# Altium PCB CH32V4x7V-R0.PcbDoc (part 1 of 3)
Units mm, origin at the board's own origin, x right, y up, seen from the top; angles counter-clockwise.
Board outline 106.4 x 69.09 mm, 2 copper layers (Top Layer, Bottom Layer); 78 components, 117 nets, 431 pads, 740 vias.
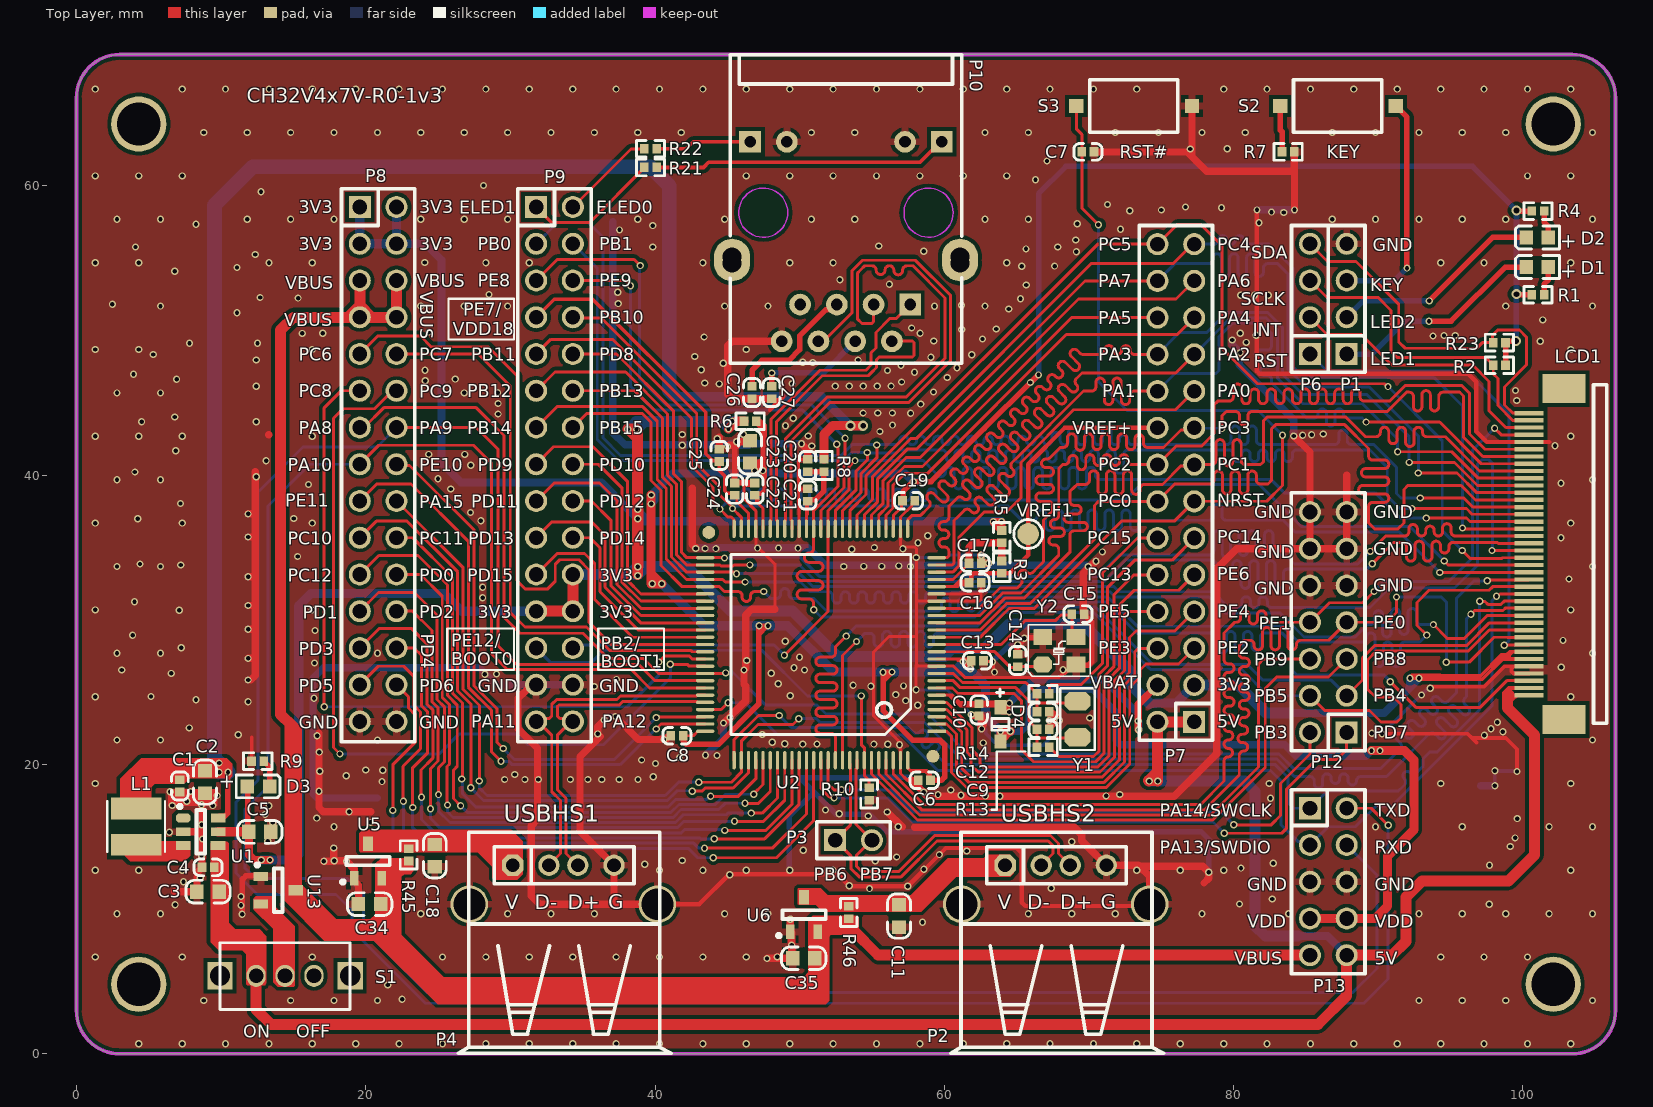
[diagram p0: Top Layer view]
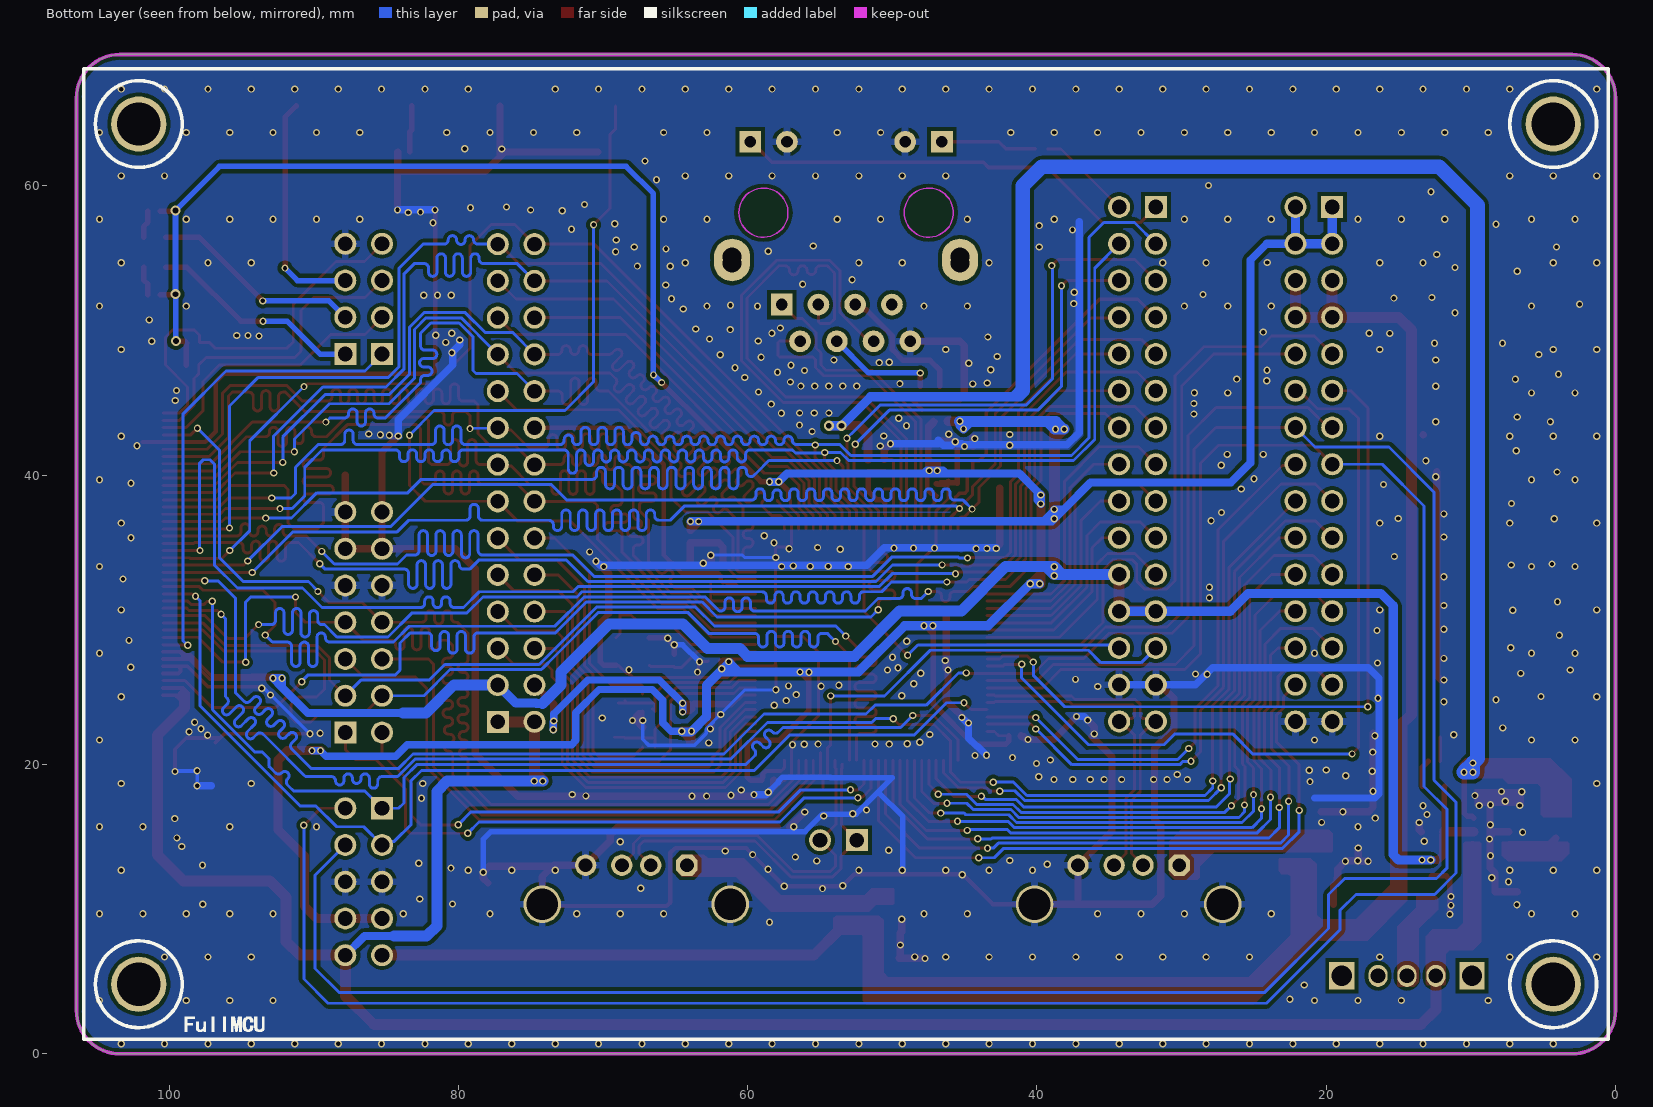
[diagram p1: Bottom Layer view, seen from below]

## Layer stack, top to bottom
Top Solder: solder mask 0.0102, Solder Resist, Dk 3.5
Top Layer: signal copper 0.0356
Dielectric 1: dielectric 0.32, FR-4, Dk 4.8
Bottom Layer: signal copper 0.0356
Bottom Solder: solder mask 0.0102, Solder Resist, Dk 3.5

## Board outline
0,3 0,66.09 cw(c3,66.09) 3,69.09 103.4,69.09 cw(c103.4,66.09) 106.4,66.09 106.4,3 cw(c103.4,3) 103.4,0 3,0 cw(c3,3)

## Design rules (kind name [scope] priority, off if disabled: settings)
Clearance Clearance_1 [InPolygon] p1: gap=0.254 ignorepadtopadclearanceinfootprint=FALSE
Clearance [All] p2: gap=0.152 ignorepadtopadclearanceinfootprint=FALSE except(0.203: Arc-Via Track-Via SMDPad-Via THPad-Via Via-Via Via-Fill Via-Poly Via-Region Via-Hole)
ComponentClearance [All] p1 off: gap=0.254 collisioncheckmode=3 verticalgap=0.254 showdistances=FALSE
DiffPairsRouting [All] p1: maxlimit=0.254 minlimit=0.178 mostfreqgap=0.203 toplayer_minwidth=0.152 toplayer_maxwidth=0.381 toplayer_prefwidth=0.203 bottomlayer_minwidth=0.152 bottomlayer_maxwidth=0.381 bottomlayer_prefwidth=0.203 maxuncoupledlength=12.7
MinimumSolderMaskSliver [All] p1 off: minsoldermaskwidth=0.254
PolygonConnect PolygonConnect_1 [IsVia] p1: connectstyle=Direct reliefconductorwidth=0.254 reliefentries=4 polygonreliefangle="90 Angle" airgapwidth=0.254
PolygonConnect [All] p2: connectstyle=Relief reliefconductorwidth=0.508 reliefentries=4 polygonreliefangle="90 Angle" airgapwidth=0.254
RoutingVias [All] p1: holewidth=0.406 width=0.711 viastyle="Through Hole" minholewidth=0.3 minwidth=0.5 maxholewidth=0.711 maxwidth=1.27
SilkToSilkClearance [All] p1 off: silktosilkclearance=0.254
SilkToSolderMaskClearance [IsPad] p1 off: minsilkscreentomaskgap=0.254 clearancetoexposedcopper=TRUE
SolderMaskExpansion [All] p1: expansion=0.051 istentingtop=FALSE
Width [All] p1: maxlimit=2.54 minlimit=0.127 preferedwidth=0.254
25 further rules are at their usual default settings.

## Classes and differential pairs
component class CH32V467VET-R0: C1 C2 C3 C4 C5 C6 C7 C8 C9 C10 C11 C12 C13 C14 C15 C16 C17 C18 C19 C20 C21 C22 C23 C24 C25 C26 C27 C34 C35 D1 D2 D3 D4 L1 LCD1 P1 P2 P3 P4 P6 P7 P8 P9 P10 P12 P13 R1 R2 R3 R4 R5 R6 R7 R8 R9 R10 R13 R14 R21 R22 R23 R45 R46 S1 S2 S3 U1 U2 U5 U6 U13 VREF1 Y1 Y2
differential pair MDIR: +MDIRP -MDIRN
differential pair MDIT: +MDITN -MDITP
differential pair PA12PA11: +PA12 -PA11
differential pair PB6PB7: +PB6 -PB7

## Components (designator, comment, footprint, x,y, rotation, side; value= is the part's Value field where it differs from the comment)
C1 "NC(0.1uF)" 0402_C 7.154,18.098 r180 top
C2 "NC(10uF)" 0603_C 8.882,18.022 r90 top
C3 "10uF" 0603_C 8.33,11.212 r0 top
C4 "1uF" 0402_C 8.675,12.889 r90 top
C5 "10uF" 0603_C 13.442,15.352 r180 top
C6 "0.1uF" 0402_C 58.186,18.912 r90 top
C7 "22nF" 0402_C 70.349,62.35 r270 top
C8 "0.1uF" 0402_C 41.94,21.989 r270 top
C9 "12pF" 0402_C 67.254,22.434 r270 top
C10 "0.1uF" 0402_C 62.396,23.358 r180 top
C11 "10uF" 0603_C 56.864,10.295 r270 top
C12 "12pF" 0402_C 67.254,23.662 r270 top
C13 "0.1uF" 0402_C 61.852,27.168 r90 top
C14 "18pF" 0402_C 65.071,27.621 r0 top
C15 "18pF" 0402_C 69.663,30.403 r270 top
C16 "0.1uF" 0402_C 61.702,32.581 r90 top
C17 "0.1uF" 0402_C 61.702,33.921 r90 top
C18 "10uF" 0603_C 24.775,14.473 r270 top
C19 "0.1uF" 0402_C 57.954,38.239 r270 top
C20 "2.2uF" 0402_C 50.553,41.099 r0 top
C21 "0.1uF" 0402_C 50.553,39.058 r0 top
C22 "0.1uF" 0402_C 46.9,39.461 r0 top
C23 "10uF" 0603_C 46.57,42.387 r270 top
C24 "0.1uF" 0402_C 45.502,39.461 r0 top
C25 "2.2uF" 0402_C 44.441,41.795 r0 top
C26 "0.1uF" 0402_C 46.702,45.293 r180 top
C27 "0.1uF" 0402_C 48.055,45.293 r180 top
C34 "10uF" 0603_C 21.037,10.349 r180 top
C35 "10uF" 0603_C 51.047,6.61 r180 top
D1 "BLUE" 0603+ 101.758,54.392 r180 top
D2 "RED" 0603+ 101.758,56.437 r180 top
D3 "RED" 0603+ 11.81,18.492 r0 top
D4 "B0520WS" SOD-323 63.875,23.953 r270 top
L1 "NC(2.2uH)" CD32 4.13,15.713 r90 top
LCD1 "NC(MY-RGB)" FPC40P-0.5-FK750M3 101.63,34.545 r270 top
P1 "HEADER 4" SIP4-2.54mm 87.813,48.38 r180 top
P2 "USBHS2" USBAF 64.198,13.039 r0 top
P3 "HEADER 2" SIP2-2.54mm 52.451,14.77 r270 top
P4 "USBHS1" USBAF 30.162,13.039 r0 top
P6 "NC(HEADER 4)" SIP4-2.54mm 85.273,48.38 r180 top
P7 "HEADER 14x2" IDC28-2.54MM 77.272,22.955 r180 top
P8 "HEADER 15x2" IDC30-2.54MM 19.588,58.54 r0 top
P9 "HEADER 15x2" IDC30-2.54MM 31.78,58.54 r0 top
P10 "HR911105A" HR911105A 57.645,51.801 r180 top
P12 "HEADER 7x2" IDC14-2.54mm 87.813,22.218 r180 top
P13 "LINK" IDC10-2.54mm 85.273,6.818 r0 top
R1 "1K" 0402 100.613,52.477 r0 top
R2 "NC(4.7K)" 0402 98.792,47.609 r180 top
R3 "0R" 0402 63.961,34.065 r270 top
R4 "1K" 0402 100.613,58.264 r0 top
R5 "0R" 0402 63.961,36.178 r270 top
R6 "0R" 0402 46.151,43.727 r0 top
R7 "10K" 0402 84.192,62.35 r180 top
R8 "NC(0R)" 0402 51.676,40.249 r90 top
R9 "1K" 0402 12.958,20.238 r180 top
R10 "10K" 0402 54.796,17.541 r90 top
R13 "NC(0R)" 0402 67.254,21.207 r180 top
R14 "NC(0R)" 0402 67.254,24.89 r180 top
R21 "470" 0402 39.258,61.28 r0 top
R22 "470" 0402 39.258,62.562 r0 top
R23 "NC(4.7K)" 0402 98.792,49.17 r180 top
R45 "NC(0Ω)" 0402 22.959,13.33 r90 top
R46 "NC(0Ω)" 0402 53.397,9.347 r90 top
S1 "SW SPDT" SW1 14.421,5.392 r0 top
S2 "KEY" SMD_6.1x3.65x2.5mm-KEY 91.216,65.525 r180 top
S3 "RST#" SMD_6.1x3.65x2.5mm-KEY 77.119,65.525 r180 top
U1 "CH2003V" SOT-23-6 7.394,16.302 r270 top
U2 "CH32V467VET" LQFP100 59.464,22.298 r90 top
U5 "CH213" SOT-23-3 19.216,12.132 r0 top
U6 "CH213" SOT-23-3 49.355,8.427 r0 top
U13 "CH213" SOT-23-3 12.752,12.26 r270 top
VREF1 "PAD" TESTPOINT1 65.796,35.938 r90 top
Y1 "32768Hz" FC-135 69.199,21.888 r90 top
Y2 "25MHz" XT3225 66.799,26.917 r0 top
? "" HOLE 4.31,4.81 r180 bottom
? "Comment" HOLE 4.31,64.28 r180 bottom
? "Comment" HOLE 102.09,64.28 r180 bottom
? "Comment" HOLE 102.09,4.81 r180 bottom

## Footprints (in the part's own frame and the unit in brackets; to place one, negate y for a bottom-side part, rotate by r counter-clockwise, add the part's x,y. Pads: shape width x height; smd on the part's side, far side on the other; paste and mask are expansions set on the pad)
0402 [mm]
  rect 0.6x0.65 smd mask+0.051: 1(0,0) 2(0.85,0)
  silkscreen extent -0.55,-0.58 1.4,0.57
0402_C [mm]
  rect 0.65x0.6 smd mask+0.051: 1(0,0) 2(0,-0.85)
  silkscreen extent -0.58,-1.4 0.57,0.55
0603+ [mm]
  rect 0.93x0.98 smd: 1(0,0) 2(1.54,0)
  silkscreen extent -0.76,-0.79 2.27,0.79
0603_C [mm]
  rect 0.93x0.98 smd mask+0.051: 1(0,0) 2(1.54,0)
  silkscreen extent -0.76,-0.79 2.31,0.79
CD32 [mm]
  rect 1.5x3.5 smd: 1(-1.25,0) 2(1.25,0)
  silkscreen extent -1.75,-2 1.75,2
FC-135 [mil]
  oct 50x70 smd: 1(0,0) 2(98.43,0)
  silkscreen extent -35,-47 133,47
FPC40P-0.5-FK750M3 [mm]
  rect 2x3 smd: 0(-11.436,1.202) 0(11.436,1.202)
  rect 0.3x2 smd: 1(9.75,-1.202) 2(9.25,-1.202) 3(8.75,-1.202) 4(8.25,-1.202) 5(7.75,-1.202) 6(7.25,-1.202) 7(6.75,-1.202) 8(6.25,-1.202) 9(5.75,-1.202) 10(5.25,-1.202) 11(4.75,-1.202) 12(4.25,-1.202) 13(3.75,-1.202) 14(3.25,-1.202) 15(2.75,-1.202) 16(2.25,-1.202) 17(1.75,-1.202) 18(1.25,-1.202) 19(0.75,-1.202) 20(0.25,-1.202) 21(-0.25,-1.202) 22(-0.75,-1.202) 23(-1.25,-1.202) 24(-1.75,-1.202) 25(-2.25,-1.202) 26(-2.75,-1.202) 27(-3.25,-1.202) 28(-3.75,-1.202) 29(-4.25,-1.202) 30(-4.75,-1.202) 31(-5.25,-1.202) 32(-5.75,-1.202) 33(-6.25,-1.202) 34(-6.75,-1.202) 35(-7.25,-1.202) 36(-7.75,-1.202) 37(-8.25,-1.202) 38(-8.75,-1.202) 39(-9.25,-1.202) 40(-9.75,-1.202)
  silkscreen extent -11.7,3.24 11.7,4.17, body extent -12.2,-1.75 12.2,4.55, height 2
HOLE [mm]
  round 3.81 hole 3: 0(0,0)
  silkscreen extent -3,-3 3,3
HR911105A [mm]
  rect 1.5x1.5 hole 0.8: 1(0,0) 9(-2.175,-11.252) 12(11.075,-11.252)
  round 1.5 hole 0.8: 2(1.27,2.54) 3(2.54,0) 4(3.81,2.54) 5(5.08,0) 6(6.35,2.54) 7(7.62,0) 8(8.89,2.54) 10(0.365,-11.252) 11(8.535,-11.252)
  round 2.5 hole 1.3: ""(-3.43,-2.852) ""(-3.43,-3.3) ""(12.32,-3.3) ""(12.32,-2.852)
  Keep-Out Layer circle w0.1: c10.165,-6.352 r1.7
  Keep-Out Layer circle w0.1: c-1.265,-6.352 r1.7
  silkscreen extent -3.55,-17.27 12.45,4.06
IDC10-2.54mm [mil]
  rect 60x60 hole 40: 1(0,400)
  round 60 hole 40: 2(100,400) 3(0,300) 4(100,300) 5(0,200) 6(100,200) 7(0,100) 8(100,100) 9(0,0) 10(100,0)
  silkscreen extent -50,-50 150,450
IDC14-2.54mm [mil]
  rect 60x60 hole 40: 1(0,0)
  round 60 hole 40: 2(100,0) 3(0,-100) 4(100,-100) 5(0,-200) 6(100,-200) 7(0,-300) 8(100,-300) 9(0,-400) 10(100,-400) 11(0,-500) 12(100,-500) 13(0,-600) 14(100,-600)
  silkscreen extent -50,-652 151,50
IDC28-2.54MM [mil]
  rect 60x60 hole 40: 1(0,0)
  round 60 hole 40: 2(100,0) 3(0,-100) 4(100,-100) 5(0,-200) 6(100,-200) 7(0,-300) 8(100,-300) 9(0,-400) 10(100,-400) 11(0,-500) 12(100,-500) 13(0,-600) 14(100,-600) 15(0,-700) 16(100,-700) 17(0,-800) 18(100,-800) 19(0,-900) 20(100,-900) 21(0,-1000) 22(100,-1000) 23(0,-1100) 24(100,-1100) 25(0,-1200) 26(100,-1200) 27(0,-1300) 28(100,-1300)
  silkscreen extent -50,-1351 150,50
IDC30-2.54MM [mil]
  rect 60x60 hole 40: 1(0,0)
  round 60 hole 40: 2(100,0) 3(0,-100) 4(100,-100) 5(0,-200) 6(100,-200) 7(0,-300) 8(100,-300) 9(0,-400) 10(100,-400) 11(0,-500) 12(100,-500) 13(0,-600) 14(100,-600) 15(0,-700) 16(100,-700) 17(0,-800) 18(100,-800) 19(0,-900) 20(100,-900) 21(0,-1000) 22(100,-1000) 23(0,-1100) 24(100,-1100) 25(0,-1200) 26(100,-1200) 27(0,-1300) 28(100,-1300) 29(0,-1400) 30(100,-1400)
  silkscreen extent -50,-1455 150,50
LQFP100 [mm]
  round 0.889 smd: 0(-1.727,0.254) 0(13.746,15.748)
  rect 0.229x1.27 smd mask+0.051: 1(0,0)
  oval 0.229x1.27 smd mask+0.051: 2(0.5,0) 3(1,0) 4(1.5,0) 5(2,0) 6(2.5,0) 7(3,0) 8(3.5,0) 9(4,0) 10(4.5,0) 11(5,0) 12(5.5,0) 13(6,0) 14(6.5,0) 15(7,0) 16(7.5,0) 17(8,0) 18(8.5,0) 19(9,0) 20(9.5,0) 21(10,0) 22(10.5,0) 23(11,0) 24(11.5,0) 25(12,0) 51(12,16) 52(11.5,16) 53(11,16) 54(10.5,16) 55(10,16) 56(9.5,16) 57(9,16) 58(8.5,16) 59(8,16) 60(7.5,16) 61(7,16) 62(6.5,16) 63(6,16) 64(5.5,16) 65(5,16) 66(4.5,16) 67(4,16) 68(3.5,16) 69(3,16) 70(2.5,16) 71(2,16) 72(1.5,16) 73(1,16) 74(0.5,16) 75(0,16)
  oval 1.27x0.229 smd mask+0.051: 26(14,2) 27(14,2.5) 28(14,3) 29(14,3.5) 30(14,4) 31(14,4.5) 32(14,5) 33(14,5.5) 34(14,6) 35(14,6.5) 36(14,7) 37(14,7.5) 38(14,8) 39(14,8.5) 40(14,9) 41(14,9.5) 42(14,10) 43(14,10.5) 44(14,11) 45(14,11.5) 46(14,12) 47(14,12.5) 48(14,13) 49(14,13.5) 50(14,14) 76(-2,14) 77(-2,13.5) 78(-2,13) 79(-2,12.5) 80(-2,12) 81(-2,11.5) 82(-2,11) 83(-2,10.5) 84(-2,10) 85(-2,9.5) 86(-2,9) 87(-2,8.5) 88(-2,8) 89(-2,7.5) 90(-2,7) 91(-2,6.5) 92(-2,6) 93(-2,5.5) 94(-2,5) 95(-2,4.5) 96(-2,4) 97(-2,3.5) 98(-2,3) 99(-2,2.5) 100(-2,2)
  silkscreen extent -0.22,1.79 12.21,14.21
SIP2-2.54mm [mil]
  rect 60x60 hole 40: 1(0,0)
  round 60 hole 40: 2(0,100)
  silkscreen extent -50,-50 50,150
SIP4-2.54mm [mil]
  rect 60x60 hole 40: 1(0,0)
  round 60 hole 40: 2(0,-100) 3(0,-200) 4(0,-300)
  silkscreen extent -50,-350 50,50
SMD_6.1x3.65x2.5mm-KEY [mm]
  rect 1x1 smd: 1(0,0) 2(8,0)
  silkscreen extent 0.98,-1.83 7.08,1.83
SOD-323 [mm]
  rect 1x0.83 smd: 1(0,0) 2(2.36,0)
  silkscreen extent -1.28,-0.6 1.58,0.6
SOT-23-3 [mm] "SOT-23-3"
  rect 0.6x1 smd: 1(0,0) 2(1.9,0)
  rect 0.7x1 smd: 3(0.95,2.4)
  silkscreen extent -0.93,-0.38 2.45,1.49
SOT-23-6 [mm] "SOT-23-6"
  oct 0.6x1 smd: 1(0,0)
  rect 0.6x1 smd: 2(0.95,0) 3(1.9,0) 5(0.95,2.4) 6(0,2.4)
  rect 0.6x1.04 smd: 4(1.9,2.4)
  silkscreen extent -0.93,-0.38 2.45,1.49
SW1 [mm]
  rect 1.75x1.9 hole 1.4: 0(-4.5,0) 0(4.5,0)
  oval 1.321x1.524 hole 1.016: 1(0,0) 2(-2,0) 3(2,0)
  silkscreen extent -4.51,-2.31 4.5,2.29
TESTPOINT1 [mm]
  round 1.5 smd: 1(0,0)
  silkscreen extent -1,-1 1,1
USBAF [mm]
  round 2.6 hole 2.2: 0(-3,-2.7) 0(10,-2.7)
  oct 1.473x1.473 hole 0.965: 1(0,0)
  round 1.473 hole 0.965: 2(2.5,0) 3(4.5,0) 4(7,0)
  silkscreen extent -3.75,-12.99 10.95,2.29
XT3225 [mm]
  oct 1.3x1.1 smd: 1(0,0)
  rect 1.3x1.1 smd: 2(2.3,0) 3(2.3,1.9) 4(0,1.9)
  silkscreen extent -1.02,-0.8 3.27,2.74

## Part data
C1 C2 C3 C4 C5 C6 C7 C8 C9 C10 C11 C12 C13 C14 C15 C16 C17 C18 C19 C20 C21 C22 C23 C24 C25 C26 C27 C34 C35: library part CAP, "Capacitor"
D1 D2 D3: library part LED0, "Typical INFRARED GaAs LED", LatestRevisionDate=08-Jul-2005, LatestRevisionNote="Mech Layer 1 removed.", PackageDescription="LED; 2 Leads", PackageReference=LED-0, Published=8-Jun-2000, Publisher="Altium Limited"
D4: library part DIODE, "Diode"
L1: library part INDUCTOR
LCD1: library part MY-RGB
P1: "Header, 4-Pin"
P2 P4: library part USB, "USB Port"
P3: "Header, 2-Pin"
P6: library part "HEADER 4", "Header, 4-Pin"
P7: "Header, 14-Pin, Dual row"
P8 P9: "Header, 15-Pin, Dual row"
P12: "Header, 7-Pin, Dual row"
P13: library part "Header 5X2H", "Header, 5-Pin, Dual row, Right Angle", LatestRevisionDate=17-Jul-2002, LatestRevisionNote="Re-released for DXP Platform.", Publisher="Altium Limited"
R1 R2 R4 R7 R9 R10 R13 R14 R21 R22 R23 R45 R46: library part RES
R3 R5 R6 R8: library part R
S2 S3: library part KEY1
U1: "Step-Down DC-DC Converter, 5V input, 1.23V * 800mA output, with LDO 3.3V * 200mA"
U2: "RISC-V FPU HD-MCU, 175MHz, USB_480M, 100M Ethernet & Phy, CAN, DVP, ADC, DAC, SRAM"
U5 U6 U13: library part CH213E, "Ideal Diode 5V*1A"
VREF1: "焊盘"
Y1 Y2: library part XTAL, "Crystal Oscillator", LatestRevisionDate=17-Jul-2002, LatestRevisionNote="Re-released for DXP Platform.", PackageDescription="Crystal, Thru-Hole; 2 Leads; Body 3.1 x 8.2 mm (Dia.xH)", PackageReference=R38, Published=8-Jun-2000, Publisher="Altium Limited"

## Via types
v1: diameter 0.5, hole 0.3, Top Layer to Bottom Layer, tented both sides, 735 vias
v2: diameter 0.7, hole 0.4, Top Layer to Bottom Layer, tented both sides, 5 vias

## Nets (pads, with @x,y where several pads share a name; then routed paths per layer and width w, separated by ;. In a path a pad name is that pad's centre, name@x,y a point inside that pad or via, vN(x,y) a via of type N, cw(c..) or ccw(c..) an arc to the next point about the centre after c; other vN are vias at no path point)
1V2: C1.2 C2.2 L1.2 R8.2 U1.6 | length 122.1
  Top Layer w0.381: U1.6@9.794,16.302 9.904,16.412 10.248,16.412 10.471,16.635 10.471,19.255 v1@10.355,19.37
  Top Layer w0.635: L1.2@4.13,17.395 4.13,18.316 5.298,19.483 C2.2@8.803,19.483 ; R8.2@51.676,41.117 51.676,42.811 52.303,43.438 53.502,43.438 53.514,43.426 53.535,43.426 53.539,43.421 v2(54.385,43.421) ; C2.2@8.803,19.483 10.468,19.483 10.468,19.51 9.851,20.127 9.447,20.127 C2.2@8.803,19.483
  Bottom Layer w0.635: 40.782,46.269 40.782,45.816 41.172,45.426 41.679,45.426 ; 40.972,46.133 41.679,45.426 ; v2(54.385,43.421) v2(53.502,43.421) 51.497,45.426 41.679,45.426
  Bottom Layer w1.016: 40.972,46.133 40.972,60.021 39.678,61.315 12.187,61.315 9.541,58.67 9.541,20.427 v1(9.862,20.105) ; v1(9.862,20.105) 10.48,19.488 v1(10.48,19.461) v1(9.862,19.461) v1(9.862,20.105)
3V3: C5.2 D3.1 LCD1.6 LCD1.7 P7.3 P8.1 P8.2 P8.3 P8.4 P9.22 P9.23 P9.24 R5.1 R6.1 U1.5 | length 238.4
  Top Layer w0.254: v1@92.163,25.972 v1@92.228,25.972 ; v1@92.192,26.041 92.302,26.15 94.266,26.15 ; v1@92.206,25.993 v1@92.228,25.972 ; v1@92.834,25.902 97.183,25.902 98.577,27.295 98.581,27.295 ; v1@92.834,26.142 97.084,26.142 98.512,27.571 98.857,27.571 ; 93.486,25.972 v1@92.228,25.972 ; 93.495,25.963 v1(92.808,25.963) 92.236,25.963 v1@92.228,25.972 ; 98.774,27.45 98.86,27.45 99.015,27.295 ; 99.055,27.376 99.055,27.571 ; LCD1.6@100.428,27.295 99.015,27.295 ; LCD1.7@100.428,27.795 99.279,27.795 ; 98.581,27.295 98.857,27.571 ; 98.581,27.295 99.015,27.295 ; 98.857,27.571 99.055,27.571 ; 98.857,27.571 99.081,27.795 99.279,27.795 ; 99.055,27.571 99.279,27.795
  Top Layer w0.381: D3.1@11.81,18.492 11.856,18.446 11.856,15.398 C5.2@11.902,15.352
  Top Layer w0.508: v1(63.388,36.803) 63.4,36.791 v1@63.867,36.791 ; v1@63.398,36.763 63.398,36.716 63.936,36.178 R5.1@63.961,36.178 63.961,36.797 v1(63.955,36.803)
  Top Layer w0.559: C5.2@11.902,15.352 11.902,15.178 11.939,15.142 11.939,13.757 12.292,13.404 v1(12.777,13.404) ; v1@12.779,13.404 v1(13.38,13.404)
  Top Layer w0.635: U1.5@9.794,15.352 C5.2@11.902,15.352 ; v1(45.073,43.203) 45.597,43.727 R6.1@46.151,43.727
  Top Layer w0.762: P9.23@31.78,30.6 P9.24@34.32,30.6 P9.22@34.32,33.14 ; v1(38.117,43.183) v1(38.713,43.183) 38.792,43.104 38.792,42.564 ; v1@38.214,43.141 38.792,42.564 ; v1@38.797,33.134 v1(38.797,33.679) 38.803,33.685 v1(38.803,36.985) v1(38.803,37.639) 38.792,37.651 38.792,42.564
  Bottom Layer w0.559: P8.4@22.128,56 24.116,56 25.25,54.865 25.25,40.841 26.598,39.494 36.294,39.494 38.149,37.639 ; v1(63.955,36.803) 63.941,36.817 39.546,36.817 ; 83.832,23.563 90.408,23.563 92.182,25.337 ; v1@92.182,25.914 92.182,25.337 ; v1(92.189,25.963) 92.773,25.963 v1@92.79,25.946 ; v1(92.808,25.963) 92.182,25.337 ; 38.149,37.639 v1(38.803,36.985) ; 38.149,37.639 v1(38.803,37.639) v1@38.803,37.56 ; v1(38.803,36.985) v1@38.803,37.56 ; v1(38.803,36.985) 38.971,36.817 39.546,36.817 ; v1@38.803,37.56 39.546,36.817
  Bottom Layer w0.635: v1(12.777,13.404) v1(13.38,13.404) 15.001,13.404 15.373,13.776 15.373,30.977 16.228,31.832 25.399,31.832 26.631,30.6 P9.23@31.78,30.6 P9.24@34.32,30.6 ; P8.1@19.588,58.54 P8.3@19.588,56 P8.4@22.128,56 P8.2@22.128,58.54 ; 44.513,43.701 44.575,43.701 v1(45.073,43.203) 45.326,43.455 45.326,43.701 v1(45.326,43.727) ; 74.17,24.225 74.592,24.225 74.617,24.25 76.027,24.25 P7.3@77.272,25.495
  Bottom Layer w0.762: P9.22@34.32,33.14 38.258,33.14 ; v1(38.117,43.183) v1(38.713,43.183) 38.768,43.183 39.286,43.701 ; v1@38.259,43.261 38.698,43.701 39.286,43.701 ; 39.335,33.665 38.81,33.14 38.258,33.14 ; 44.513,43.701 39.286,43.701 ; 44.575,43.701 45.326,43.701 v1@45.349,43.701 ; 74.17,24.225 72.899,25.496 72.899,26.39 69.576,29.713 64.456,29.713 62.761,28.018 60.537,28.018 60.004,27.485 52.615,27.485 49.488,30.612 45.231,30.612 42.164,33.679 v1(38.797,33.679) 38.258,33.14 ; P7.3@77.272,25.495 80.315,25.495 82.246,23.563 83.187,23.563 83.832,23.563
  other v1: 38.797,33.047
+5V: C3.2 C4.2 LCD1.1 LCD1.2 P7.1 P7.2 P13.10 S1.2 U1.4 | length 164
  Top Layer w0.254: 98.676,24.403 98.676,24.797 98.676,24.963 98.914,25.201 99.008,25.295 99.235,25.295 ; 98.737,24.729 98.737,24.797 98.93,24.991 ; 99.039,24.407 99.19,24.407 99.37,24.587 ; 99.162,24.795 99.116,24.795 98.93,24.981 ; LCD1.1@99.491,24.708 99.37,24.587 ; LCD1.1@100.428,24.795 99.578,24.795 99.404,24.795 ; LCD1.2@100.428,25.295 99.235,25.295 ; 98.93,24.981 98.93,24.991 ; 98.93,24.981 98.93,24.512 99.188,24.77 ; 98.93,24.991 99.061,25.122 ; 99.061,25.122 99.155,25.216 99.235,25.295 ; 99.061,25.122 99.078,25.122 99.14,25.06 99.225,24.974 99.404,24.795 ; 99.188,24.77 99.213,24.795 99.404,24.795 ; 99.188,24.77 99.37,24.587
  Top Layer w0.762: U1.4@9.832,14.313 9.832,12.889 9.832,11.25 C3.2@9.87,11.212 ; S1.2@12.421,5.392 12.421,3.072 13.447,2.046 85.845,2.046 87.813,4.014 P13.10@87.813,6.818 90.952,6.818 91.901,7.767 91.901,10.829 93.032,11.96 99,11.96 100.782,13.743 100.782,22.046 98.93,23.897 98.93,24.512 ; v1@74.114,18.881 74.732,19.499 ; v1(74.157,18.855) 74.188,18.886 v1@74.692,18.886 ; v1(74.745,18.855) 74.732,18.867 74.732,19.499 ; P7.1@77.272,22.955 P7.2@74.732,22.955 74.732,19.499
  Top Layer w1.016: U1.4@9.87,14.192 9.87,8.401 10.317,7.955 11.975,7.955 12.421,7.508 S1.2@12.421,5.392
  Bottom Layer w0.559: 84.45,8.136 86.495,8.136 P13.10@87.813,6.818
  Bottom Layer w0.762: v1(74.157,18.855) v1(74.745,18.855) 80.773,18.855 81.483,18.145 81.483,8.849 82.196,8.136 84.45,8.136
BOOT0: P9.25 R10.2 U2.94 | length 31.1
  Top Layer w0.203: v1(54.259,24.745) 54.259,21.371 54.464,21.165 54.464,19.243 54.796,18.911 R10.2@54.796,18.391
  Bottom Layer w0.203: P9.25@31.78,28.06 32.796,27.044 35.586,27.044 36.444,27.901 47.377,27.901 50.534,24.745 v1(54.259,24.745)
BOOT1: LCD1.25 P9.26 U2.37 | length 99.4
  Top Layer w0.203: v1(48.942,27.551) 51.964,30.574 U2.37@51.964,36.298 51.964,37.551 53.42,39.007 53.42,40.614 v1(53.819,41.013) ; v1(93.32,37.037) 96.102,37.037 96.344,36.795 LCD1.25@100.428,36.795
  Bottom Layer w0.203: P9.26@34.32,28.06 34.517,28.257 48.236,28.257 v1(48.942,27.551) ; v1(53.819,41.013) 58.533,41.013 59.36,40.186 59.551,39.996 ccw(c59.766,40.211) 60.071,40.211 60.071,40.245 cw(c60.376,40.245) 60.68,40.245 60.68,39.36 ccw(c60.985,39.36) 61.29,39.36 61.29,40.245 cw(c61.595,40.245) 61.9,40.245 61.9,39.36 ccw(c62.204,39.36) 62.509,39.36 62.509,40.245 cw(c62.814,40.245) 63.119,40.245 63.119,39.36 ccw(c63.424,39.36) 63.728,39.36 63.728,40.245 cw(c64.033,40.245) 64.338,40.245 64.338,39.36 ccw(c64.643,39.36) 64.948,39.36 64.948,40.245 cw(c65.252,40.245) 65.557,40.245 65.557,39.36 ccw(c65.862,39.36) 66.167,39.36 66.167,40.245 cw(c66.472,40.245) 66.776,40.245 66.776,39.36 ccw(c67.081,39.36) 67.386,39.36 67.386,40.245 cw(c67.691,40.245) 67.996,40.245 67.996,39.36 ccw(c68.3,39.36) 68.605,39.36 68.605,40.245 cw(c68.91,40.245) 69.215,40.245 69.215,39.36 ccw(c69.52,39.36) 69.824,39.36 69.824,40.245 cw(c70.129,40.245) 70.434,40.245 70.434,40.022 ccw(c70.739,40.022) 70.739,39.717 71.275,39.717 82.567,39.717 83.498,38.787 89.78,38.787 91.529,37.037 v1(93.32,37.037)
ELED0: P9.2 R22.1 | length 6.6
  Top Layer w0.203: P9.2@34.32,58.54 38.342,62.562 R22.1@39.258,62.562
ELED1: P9.1 R21.1 | length 9.5
  Top Layer w0.203: P9.1@31.78,58.54 32.862,57.459 35.461,57.459 39.258,61.255 R21.1@39.258,61.28
GND: C1.1 C2.1 C3.1 C4.1 C5.1 C6.1 C7.1 C8.2 C9.1 C10.1 C11.2 C12.1 C13.2 C14.1 C15.1 C16.2 C17.2 C18.2 C19.1 C20.1 C21.1 C22.1 C23.1 C24.1 C25.1 C26.1 C27.1 C34.2 C35.2 LCD1.4 LCD1.5 LCD1.36 P1.4 P2.0 P2.4 P4.0 P4.4 P8.29 P8.30 P9.27 P9.28 P10.8 P10.10 P10.11 P12.9 P12.10 P12.11 P12.12 P12.13 P12.14 P13.5 P13.6 R7.1 R9.2 R10.1 S3.1 U1.2 U2.10 U2.19 U2.20 U2.27 U2.41 U2.47 U2.99 U5.1 U6.1 U13.1 Y2.2 Y2.4 | length 601.6
  Top Layer w0.203: 46.1,39.661 46.151,39.61 46.151,39.534 46.151,39.47 46.151,38.352 46.964,37.538 U2.47@46.964,36.298 46.964,35.166 48.283,33.848 48.283,30.727 ; 46.322,39.285 C22.1@46.924,39.285 ; U2.41@49.964,36.298 49.964,37.584 49.923,37.625 49.923,39.065 ; C20.1@50.502,41.099 50.042,41.099 49.923,40.98 49.923,39.065 ; C21.1@50.553,39.058 49.931,39.058 49.923,39.065 ; 57.696,18.953 57.395,18.953 ; C19.1@57.954,38.239 57.756,38.041 57.756,37.896 56.964,37.105 U2.27@56.964,36.298 56.964,35.172 57.084,35.053 57.943,35.053 58.062,34.934 v1(58.062,34.314) ; v1(58.047,25.165) 58.047,26.879 58.086,26.917 ; v1@58.086,34.291 58.086,31.298 ; C6.1@58.186,18.912 57.738,18.912 57.437,18.912 57.395,18.953 ; U2.20@59.464,31.798 62.34,31.798 62.552,32.009 ; C16.2@62.552,32.581 62.552,32.009 ; C13.2@62.702,27.168 62.76,27.11 v1(63.332,27.11) ; v1@63.389,27.042 63.389,26.863 63.41,26.842 63.41,26.088 63.35,26.028 ; v1(68.2,26.551) 68.257,26.495 68.257,26.294 ; Y2.2@69.099,26.866 68.948,26.866 68.376,26.294 68.257,26.294 ; 57.395,18.953 56.964,19.384 U2.99@56.964,20.298 56.964,21.502 55.096,23.37 55.096,27.765 56.177,28.846 58.086,28.846 ; 58.086,26.917 58.086,28.846 ; 58.086,26.917 58.205,26.798 U2.10@59.464,26.798 60.639,26.798 61.41,26.028 63.35,26.028 ; 58.086,28.846 58.086,31.298 ; 58.086,31.298 U2.19@59.464,31.298 62.433,31.298 62.552,31.417 62.552,32.009 ; 63.35,26.028 67.932,26.028 68.142,26.237 68.2,26.237 68.257,26.294
  Top Layer w0.254: R9.2@12.108,20.238 12.108,21.882 ; C9.1@67.254,22.434 67.254,22.58 v1(67.254,23.048) C12.1@67.254,23.662 ; v1(90.256,22.134) 96.169,22.134 96.472,21.831 ; v1@93.722,25.367 97.29,25.367 98.718,26.795 99.375,26.795 ; 96.782,21.522 96.472,21.831 ; v1(99.586,19.524) 99.586,21.054 98.809,21.831 96.472,21.831 ; LCD1.4@100.428,26.295 99.349,26.295 99.209,26.435 99.209,26.63 99.375,26.795 ; LCD1.5@100.428,26.795 99.375,26.795
  Top Layer w0.305: P4.0@40.516,10.353 43.055,10.353 v1@45.125,12.423 ; v1(45.16,12.388) v1@45.125,12.423 ; 47.621,45.184 48.611,45.184 ; 47.949,44.522 48.611,45.184 ; 48.844,45.417 48.611,45.184 ; v1@53.423,11.593 v1(57.467,11.593) 60.105,14.231 65.006,14.231 65.193,14.044 65.202,14.044 65.346,13.9 65.346,10.459 65.586,10.219 74.078,10.219 P2.0@74.198,10.339 ; v1(53.423,11.628) 52.628,12.423 v1@45.125,12.423 ; v1(81.608,58.344) 81.608,47.202 81.786,47.023 96.207,47.023 96.763,46.467 96.763,43.021 97.489,42.295 LCD1.36@100.428,42.295 101.813,42.295
  Top Layer w0.381: C1.1@7.051,18.019 7.089,17.981 8.74,17.981 C2.1@8.778,17.943 ; v1(11.452,9.658) 11.475,9.681 11.475,12.07 11.712,12.307 12.705,12.307 U13.1@12.752,12.26 ; v1@45.65,42.076 45.5,41.926 45.5,39.463 C24.1@45.502,39.461 45.51,39.47 46.151,39.47 C22.1@46.664,39.47 ; 46.1,39.534 46.151,39.534 ; C22.1@46.924,39.412 46.925,39.41 C22.1@46.95,39.41 ; v1@64.967,28.111 v1@65.068,28.212 ; v1(65.065,28.277) 65.068,28.274 v1@65.068,28.212 ; C14.1@65.071,27.621 65.068,27.624 v1@65.068,28.212 ; Y2.4@66.799,28.766 65.622,28.766 65.156,28.3 65.12,28.3 65.099,28.279 65.099,28.243 v1@65.068,28.212 ; Y2.2@69.099,26.866 69.953,26.866 70.18,27.093 70.18,29.862 C15.1@69.663,30.378
  Top Layer w0.508: 6.791,11.212 C3.1@8.33,11.212 8.33,12.519 8.675,12.864 C4.1@8.675,12.889 v1@8.675,15.055 ; U1.2@7.394,15.352 8.378,15.352 v1@8.675,15.055 ; C2.1@8.74,17.981 8.675,17.917 v1@8.675,15.055 ; v1(11.869,25.85) 12.048,25.85 12.355,26.157 12.355,27.337 ; v1(11.869,27.337) 12.355,27.337 ; v1(11.869,29.347) 12.355,29.347 ; v1(11.869,30.993) 12.355,30.993 ; v1(11.869,32.99) 12.355,32.99 ; v1(11.869,35.726) 12.355,35.726 ; v1(11.869,37.327) 12.355,37.327 ; 12.355,40.239 12.355,37.327 ; 13.279,42.795 13.285,42.79 ; C5.1@13.442,15.352 13.574,15.483 v1(13.574,15.991) ; v1@16.769,22.174 16.769,17.033 17.067,16.736 v1(18.85,16.736) 20.359,16.736 ; v1(17.105,13.315) 17.79,13.315 v1(17.818,13.344) ; v1(17.787,14.232) 17.787,13.374 v1(17.818,13.344) ; U5.1@19.216,12.132 19.216,12.773 v1(18.676,13.313) 18.646,13.344 v1(17.818,13.344) ; U5.1@19.228,12.148 19.228,11.921 19.497,11.651 C34.2@19.497,10.349 ; P9.27@31.78,25.52 31.506,25.52 30.863,24.877 30.821,24.877 30.524,24.58 30.524,22.466 31.871,21.118 31.871,16.206 31.446,15.78 31.446,10.922 32.028,10.339 36.996,10.339 ; v1(36.035,22.12) 36.035,22.621 v1(36.485,23.071) ; 36.214,21.942 34.811,20.539 34.811,15.39 P4.4@37.162,13.039 37.162,10.505 36.996,10.339 ; v1(37.26,23.316) 38.844,21.733 v1(40.615,21.733) 40.732,21.733 40.918,21.918 41.044,21.918 41.09,21.964 C8.2@41.09,21.989 ; P4.0@40.162,10.339 36.996,10.339 ; 42.58,39.103 42.58,35.209 v1@42.806,34.983 ; C25.1@44.438,42.003 v1@44.438,42.622 ; v1(44.727,22.87) 46.269,24.412 46.269,25.418 46.154,25.533 v1(46.154,26.539) 46.269,26.655 46.269,30.324 46.672,30.727 48.283,30.727 ; v1@45.079,42.076 v1@45.65,42.076 ; v1(45.65,42.318) 46.502,42.318 C23.1@46.57,42.387 ; v1(47.744,6.598) 47.757,6.61 v1@48.536,6.61 ; C27.1@48.055,45.293 C26.1@46.702,45.293 45.326,45.293 45.028,45.591 45.028,48.963 45.326,49.261 P10.8@48.755,49.261 ; v1(48.445,6.701) v1@48.536,6.61 ; v1(49.341,9.298) 49.341,8.441 U6.1@49.355,8.427 ; U6.1@49.445,8.389 49.445,6.673 C35.2@49.507,6.61 v1@48.536,6.61 ; v1(50.125,42.17) 50.553,41.742 C20.1@50.553,41.099 ; v1(56.051,16.723) 57.083,15.692 ; 57.694,18.955 57.696,18.953 57.738,18.912 58.186,18.463 ; 57.933,15.654 68.996,15.654 69.507,15.142 69.507,14.73 P2.4@71.198,13.039 73.418,13.039 73.48,12.977 ; C6.1@58.186,18.912 58.186,18.463 ; v1@61.999,23.395 62.359,23.395 C10.1@62.396,23.358 ; C10.1@62.37,23.333 62.395,23.333 C10.1@62.55,23.178 ; v1@62.5,34.476 62.506,34.47 62.506,33.967 C17.2@62.552,33.921 62.999,33.921 v1@63.008,33.912 ; C10.1@62.55,23.361 C10.1@62.55,23.178 ; v1(62.574,22.464) 62.55,22.487 C10.1@62.55,23.178 ; 62.7,22.76 62.7,23.029 C10.1@62.55,23.178 ; C9.1@67.254,22.58 67.715,23.042 v1(67.955,23.042) 67.489,23.508 C12.1@67.407,23.508 ; C15.1@69.612,30.447 69.612,33.185 v1(70.477,34.051) ; C7.1@70.349,62.35 76.788,62.35 77.119,62.018 ; P2.0@74.198,10.339 74.198,12.259 73.48,12.977 ; S3.1@77.119,65.525 77.119,62.018 ; 77.946,11.806 78.274,12.135 78.274,12.556 v1(78.271,12.559) 77.852,12.977 73.48,12.977 ; v1(84.157,42.717) 85.273,41.601 P12.14@85.273,37.458 P12.12@85.273,34.918 ; R7.1@84.192,62.35 84.192,61.182 ; v1(84.206,58.344) 84.206,61.168 84.192,61.182 ; 87.813,39.998 P12.13@87.813,37.458 P12.11@87.813,34.918 P12.12@85.273,34.918 ; 12.355,27.337 12.355,29.347 ; 12.355,29.347 12.355,30.993 ; 12.355,30.993 12.355,32.99 ; 12.355,32.99 12.355,35.726 ; 12.355,35.726 12.355,37.327 ; 58.186,18.463 58.459,18.19 58.459,18.156 58.798,17.817 75.894,17.817 78.825,20.749 78.825,33.53 80.213,34.918 P12.12@85.273,34.918 ; 77.119,62.018 78.12,61.018 84.028,61.018 84.192,61.182
  Bottom Layer w0.203: v1(58.047,25.165) 60.187,25.165 62.397,22.954 62.397,22.918 ; v1(58.062,34.314) 60.201,34.314 60.36,34.474 v1(62.556,34.474)
  Bottom Layer w0.254: 62.397,22.918 62.865,22.45 62.865,22.153 63.693,21.324 66.825,21.324 67.254,21.754 v1(67.254,23.048) ; v1(90.256,22.134) 90.271,22.134 93.004,24.867 93.019,24.867 93.375,25.223 v1@93.662,25.223 ; v1@98.057,18.556 v1(98.057,19.577) 98.084,19.551 99.56,19.551 v1(99.586,19.524)
  Bottom Layer w0.381: v1@49.269,12.681 49.269,16.402 50.976,18.109 ; v1@58.459,18.19 57.897,18.752 57.897,18.81 57.583,19.124 54.3,19.124 54.266,19.091 49.994,19.091 50.976,18.109 ; v1(63.332,27.11) 64.5,28.277 v1(65.065,28.277) ; v1(78.271,12.559) 78.271,14.851 77.753,15.369 56.032,15.369 54.823,16.577 52.508,16.577 50.976,18.109
  Bottom Layer w0.508: 20.808,17.692 16.655,17.692 16.358,17.99 16.358,25.964 17.082,26.688 27.868,26.688 29.037,25.52 P9.27@31.78,25.52 P9.28@34.32,25.52 ; v1(36.485,23.071) 36.73,23.316 v1(37.26,23.316) ; 37.086,57.516 37.086,42.94 37.926,42.1 45.003,42.1 45.067,42.036 45.208,42.177 45.509,42.177 v1(45.65,42.318) 45.889,42.079 46.486,42.079 46.825,42.417 ; v1@42.806,34.983 50.546,34.983 51.762,33.767 70.194,33.767 v1(70.477,34.051) ; v1(43.485,20.635) 44.1,21.25 44.149,21.25 44.727,21.828 v1@44.727,22.786 ; v1(44.727,22.87) v1@44.727,22.786 ; v1(45.189,23.249) v1@44.727,22.786 ; 46.825,42.17 v1(50.125,42.17) ; v1@58.459,18.19 58.728,17.921 v1(59.561,17.921) ; v1(79.898,49.346) 79.898,49.019 v1(80.445,48.473) 80.38,48.408 80.38,47.621 84.157,43.844 v1(84.157,42.717) ; v1(81.608,58.344) v1(84.206,58.344) ; 97.06,18.533 v1(98.057,18.533)
  other v1: 4.307,0.692 7.307,0.692 10.307,0.692 13.307,0.692 16.307,0.692 19.307,0.692 22.307,0.692 25.307,0.692 28.307,0.692 31.307,0.692 34.307,0.692 37.307,0.692 40.307,0.692 43.307,0.692 46.307,0.692 49.307,0.692 52.307,0.692 55.307,0.692 58.307,0.692 61.307,0.692 64.307,0.692 67.307,0.692 70.307,0.692 73.307,0.692 76.307,0.692 79.307,0.692 82.307,0.692 85.307,0.692 88.307,0.692 91.307,0.692 94.307,0.692 97.307,0.692 100.307,0.692 103.307,0.692 8.807,3.692 14.807,3.692 17.807,3.692 20.807,3.692 92.807,3.692 95.807,3.692 98.807,3.692 104.807,3.692 22.515,3.773 21.529,4.759 1.307,6.692 7.307,6.692 16.307,6.692 25.307,6.692 28.307,6.692 31.307,6.692 34.307,6.692 37.307,6.692 40.307,6.692 43.307,6.692 46.307,6.692 94.307,6.692 97.307,6.692 100.307,6.692 49.438,7.527 58.484,9.1 2.807,9.692 5.807,9.692 23.807,9.692 29.807,9.692 32.807,9.692 35.807,9.692 44.807,9.692 47.807,9.692 65.807,9.692 68.807,9.692 71.807,9.692 77.807,9.692 83.807,9.692 92.807,9.692 95.807,9.692 98.807,9.692 101.807,9.692 104.807,9.692 11.38,10.265 6.821,10.314 97.664,10.342 80.399,10.363 82.67,10.71 11.38,10.875 54.829,11.425 67.394,11.445 7.404,11.902 8.554,12.174 1.307,12.692 4.307,12.692 7.307,12.692 40.307,12.692 43.307,12.692 46.307,12.692 49.307,12.692 52.307,12.692 73.307,12.692 76.307,12.692 79.307,12.692 103.307,12.692 58.583,12.759 80.502,12.841 97.689,13.046 39.289,13.1 82.736,13.179 55.22,13.339 41.879,13.368 56.699,13.614 8.647,13.699 59.656,13.773 61.547,14.026 50.246,14.069 99.123,14.334 68.808,14.666 13.23,14.7 8.72,14.856 99.456,14.928 6.425,15.318 17.807,15.692 56.807,15.692 89.807,15.692 95.807,15.692 101.807,15.692 104.807,15.692 8.654,15.845 20.32,16.003 99.603,16.264 16.61,16.299 54.744,16.443 13.04,16.542 52.731,16.6 51.779,16.859 13.311,17.148 6.631,17.172 9.426,17.161 8.645,17.225 7.63,17.465 82.543,17.678 62.836,17.817 63.845,17.812 71.182,17.835 9.726,17.854 61.149,17.877 72.129,17.929 6.484,18.116 58.581,18.092 7.881,18.137 16.768,18.158 60.447,18.237 1.307,18.692 82.46,18.689 94.307,18.692 103.307,18.692 21.127,18.82 29.599,18.969 31,18.969 31.936,18.969 34.148,18.969 35.359,18.969 36.32,18.969 37.531,18.969 38.821,18.969 39.87,19.157 18.648,19.231 30.298,19.316 16.814,19.536 21.17,19.612 20.003,19.628 40.035,20.069 39.07,20.311 41.695,20.478 44.279,20.627 16.78,20.859 56.896,21.365 50.202,21.411 55.127,21.414 56.087,21.398 48.973,21.432 51.198,21.424 62.695,21.498 48.097,21.538 2.807,21.692 5.807,21.692 20.807,21.692 104.807,21.692 16.637,21.998 97.332,22.023 11.184,22.059 47.413,22.072 89.556,22.16 98.611,22.271 97.792,22.482 7.801,22.533 98.231,22.921 70.052,23.213 61.854,23.458 58.156,24.095 11.869,24.335 57.323,24.422 8.266,24.487 16.421,24.581 1.307,24.692 103.307,24.692 5.154,24.706 49.351,24.76 92.984,24.812 56.635,24.835 93.595,25.27 35.798,25.394 54.922,25.405 57.174,25.439 53.693,25.475 48.522,25.58 37.33,25.887 28.237,26.241 29.042,26.257 6.551,26.302 48.032,26.305 63.461,26.392 3.14,26.533 50.331,26.532 49.606,26.684 102.639,26.724 16.461,27.023 46.34,27.189 49.986,27.416 2.807,27.692 5.807,27.692 20.807,27.692 104.807,27.692 7.243,28.072 48.997,28.516 102.767,28.581 65.528,28.728 3.884,28.944 16.489,29.266 7.115,30.662 1.307,30.692 16.307,30.692 103.307,30.692 4.012,31.252 28.078,31.533 28.078,32.251 103.183,32.823 69.954,33.684 2.807,33.692 5.807,33.692 53.052,33.692 54.427,33.7 55.675,33.7 57.652,33.689 104.807,33.692 56.839,33.734 7.217,33.79 4.397,33.867 63.072,33.923 15.289,34.378 70.925,34.699 53.597,34.888 44.206,34.929 57.133,34.924 42.806,34.937 43.46,34.937 47.083,34.962 48.533,34.962 49.884,34.962 55.163,35.002 58.181,35.34 102.624,35.682 58.857,35.824 1.307,36.692 7.307,36.692 16.307,36.692 103.307,36.692 27.959,36.847 4.243,36.996 15.022,37.006 27.242,37.42 7.192,38.047 25.876,39.05 16.04,39.362 102.624,39.442 2.807,39.692 5.807,39.692 104.807,39.692 24.994,39.759 12.425,39.891 4.042,40.227 27.262,40.686 13.112,40.995 24.35,41.439 26.846,41.439 6.862,41.691 45.011,41.989 50.834,42.025 102.214,42.032 41.881,42.075 44.292,42.531 1.307,42.692 4.307,42.692 7.307,42.692 16.307,42.692 103.307,42.692 50.591,42.714 84.764,42.772 85.389,42.799 41.881,42.812 46.096,42.837 86.191,42.847 55.544,43.025 49.022,43.416 56.417,43.466 4.506,43.705 12.434,43.698 49.549,43.944 6.799,44.022 29.15,44.237 57.665,44.289 54.383,44.305 55.394,44.305 56.406,44.305 58.36,44.916 29.152,44.962 99.57,45.171 2.807,45.692 5.807,45.692 26.807,45.692 29.116,45.694 59.247,45.749 99.481,45.853 12.434,46.15 52.462,46.16 53.426,46.16 54.39,46.16 55.353,46.16 56.317,46.16 44.44,46.316 49.474,46.336 43.431,46.374 57.043,46.442 24.118,46.532 6.926,46.641 26.195,46.644 60.202,46.758 3.947,46.987 57.931,47.122 56.067,47.242 24.093,47.263 43.195,47.292 60.868,47.431 56.997,47.611 44.709,47.75 50.904,47.787 50.214,47.813 12.434,47.965 54.038,47.962 59.068,48.154 42.736,48.211 61.887,48.333 5.317,48.342 1.307,48.692 4.307,48.692 16.307,48.692 46.307,48.692 103.307,48.692 12.512,49.12 7.82,49.132 80.864,49.182 101.186,49.268 59.273,49.284 62.636,49.419 43.389,49.551 93.778,49.62 94.537,49.655 95.323,49.655 81.563,49.683 15.609,49.807 17.031,49.819 58.322,49.818 80.459,49.821 24.35,49.894 61.2,50.066 63.593,50.11 57.737,50.183 101.37,50.739 11.099,51.24 64.452,51.497 5.807,51.692 23.807,51.692 26.807,51.692 29.807,51.692 44.807,51.692 47.807,51.692 59.315,51.677 62.807,51.692 98.807,51.692 104.807,51.692 61.181,51.757 2.485,51.815 37.45,51.865 65.265,52.199 15.325,52.245 12.698,52.284 80.486,52.448 81.442,52.448 82.398,52.448 28.523,52.494 37.426,52.65 65.668,53.146 56.201,53.204 52.777,53.519 6.799,54.1 11.099,54.363 65.349,54.441 67.62,54.459 1.307,54.692 4.307,54.692 13.307,54.692 16.307,54.692 24.076,54.705 28.307,54.692 31.307,54.692 43.307,54.692 49.307,54.692 52.307,54.692 64.307,54.692 94.307,54.692 97.307,54.692 103.307,54.692 12.366,55.265 69.129,55.444 58.58,55.487 65.644,55.648 4.08,55.778 39.846,55.781 67.837,55.774 55.469,55.851 69.082,56.257 37.544,56.962 72.18,57.001 39.846,57.255 8.266,57.35 69.179,57.378 81.751,57.457 2.807,57.692 5.807,57.692 11.807,57.692 14.807,57.692 17.807,57.692 23.807,57.692 26.807,57.692 29.807,57.692 38.807,57.692 44.807,57.692 50.807,57.692 53.807,57.692 62.807,57.692 65.807,57.692 86.807,57.692 89.807,57.692 92.807,57.692 95.807,57.692 98.807,57.692 104.807,57.692 83.46,58.162 82.62,58.191 72.822,58.28 75.003,58.333 79.163,58.493 76.668,58.54 71.274,58.716 12.762,59.603 28.144,60.027 66.301,60.429 1.307,60.692 4.307,60.692 7.307,60.692 46.307,60.692 49.307,60.692 52.307,60.692 55.307,60.692 58.307,60.692 61.307,60.692 64.307,60.692 100.307,60.692 103.307,60.692 67.097,61.72 77.001,62.55 79.556,62.575 8.807,63.692 11.807,63.692 14.807,63.692 17.807,63.692 20.807,63.692 23.807,63.692 26.807,63.692 29.807,63.692 32.807,63.692 35.807,63.692 38.807,63.692 41.807,63.692 50.807,63.692 53.807,63.692 62.807,63.692 65.807,63.692 71.807,63.692 74.807,63.692 77.807,63.692 80.807,63.692 86.807,63.692 89.807,63.692 92.807,63.692 95.807,63.692 98.807,63.692 104.807,63.692 1.307,66.692 7.307,66.692 10.307,66.692 13.307,66.692 16.307,66.692 19.307,66.692 22.307,66.692 25.307,66.692 28.307,66.692 31.307,66.692 34.307,66.692 37.307,66.692 40.307,66.692 43.307,66.692 46.307,66.692 49.307,66.692 52.307,66.692 55.307,66.692 58.307,66.692 61.307,66.692 64.307,66.692 67.307,66.692 70.307,66.692 73.307,66.692 79.307,66.692 82.307,66.692 85.307,66.692 88.307,66.692 91.307,66.692 94.307,66.692 97.307,66.692 100.307,66.692 103.307,66.692
KEY: P1.3 S2.1 | length 16
  Top Layer w0.381: S2.1@91.216,65.525 91.98,64.761 v1(91.98,54.32)
  Bottom Layer w0.381: P1.3@87.813,53.46 91.121,53.46 v1(91.98,54.32)
LED1: D1.2 P1.1 | length 14.9
  Top Layer w0.381: v1(93.503,50.65) 95.036,50.65 98.777,54.392 D1.2@100.218,54.392
  Bottom Layer w0.381: P1.1@87.813,48.38 89.557,48.38 91.839,50.662 93.492,50.662 v1(93.503,50.65)
LED2: D2.2 P1.2 | length 14.7
  Top Layer w0.381: v1(93.514,52.051) 97.901,56.437 D2.2@100.218,56.437
  Bottom Layer w0.381: P1.2@87.813,50.92 88.944,52.051 v1(93.514,52.051)
MDIRN: P10.6 U2.42 | length 38.1
  Top Layer w0.203: U2.42@49.464,36.298 49.464,36.826 49.405,36.885 49.405,42.368 52.074,45.037 57.545,45.037 60.434,47.926 60.434,52.416 57.986,54.864 57.326,54.864 54.346,54.864 53.965,54.483 53.6,54.118 53.6,51.218 51.643,49.261 P10.6@51.295,49.261
MDIRP: P10.3 U2.43 | length 38.5
  Top Layer w0.203: U2.43@48.964,36.298 48.964,36.826 49.024,36.885 49.024,42.526 51.916,45.418 57.388,45.418 60.053,48.084 60.053,52.258 57.828,54.483 57.521,54.483 57.419,54.483 ccw(c57.419,54.178) 57.114,54.178 57.114,54.159 cw(c56.81,54.159) 56.505,54.159 56.505,54.178 ccw(c56.2,54.178) 55.895,54.178 cw(c55.59,54.178) 55.286,54.178 ccw(c54.981,54.178) 54.981,54.483 54.503,54.483 54.211,54.191 53.981,53.96 53.981,50.819 54.301,50.499 54.986,50.499 55.105,50.618 P10.3@55.105,51.801 54.817,51.801 54.817,51.899 P10.3@54.778,51.899
MDITN: P10.2 U2.44 | length 21.6
  Top Layer w0.203: U2.44@48.464,36.298 48.464,36.826 48.405,36.885 48.405,43.713 51.515,46.824 51.569,46.877 54.734,46.877 54.94,47.084 55.311,47.455 55.311,47.989 55.497,48.175 57.789,48.175 57.908,48.294 57.908,49.169 57.789,49.288 56.402,49.288 P10.2@56.375,49.261
MDITP: P10.1 U2.45 | length 21.6
  Top Layer w0.203: U2.45@47.964,36.298 47.964,36.826 48.024,36.885 48.024,43.871 51.411,47.258 54.576,47.258 54.93,47.613 54.93,48.463 55.265,48.797 55.265,49.868 56.245,50.848 56.692,50.848 P10.1@57.645,51.801